# Altium PCB OmniCore_SDR.PcbDoc (part 9 of 13)
Units mil, origin at the board's own origin, x right, y up, seen from the top; angles counter-clockwise.
Board outline 4724.72 x 2755.91 mil, 8 copper layers (Top, GND 1, Layer 1, Layer 2, GND 2, Layer 3, Power, Bottom), stack 40.468 mil thick; 530 components, 427 nets, 2315 pads, 1715 vias.
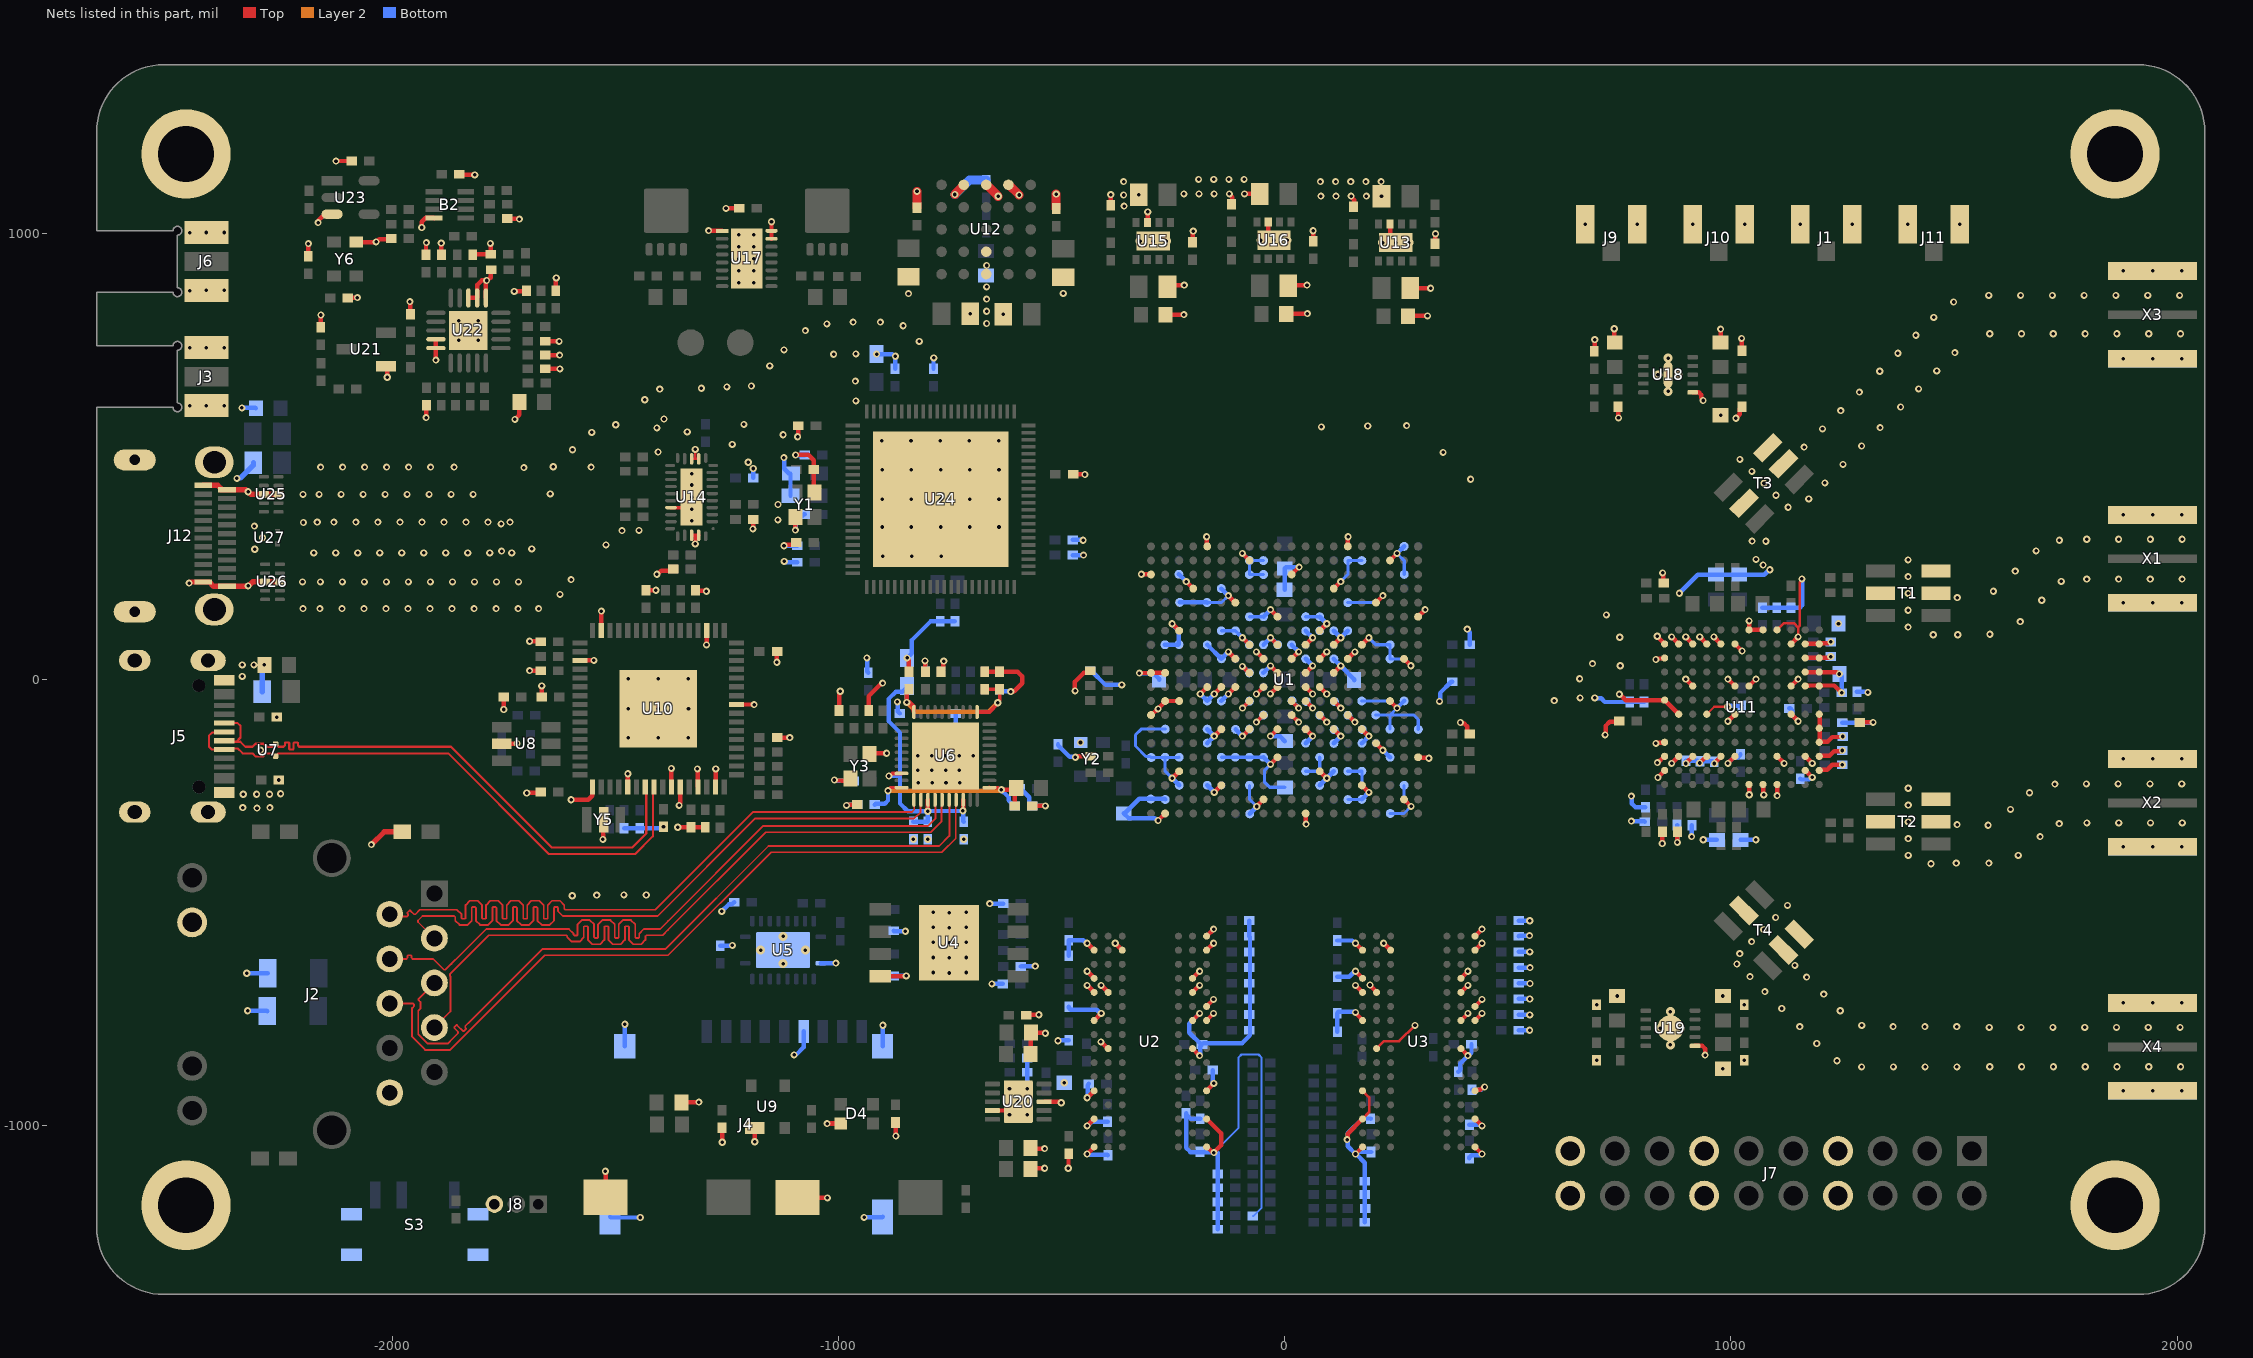
[diagram p14: the nets of this part, all layers, seen from the top]

## Via types
v1: diameter 16, hole 8, Top to Bottom, tented both sides, 1667 vias
v2: diameter 19.68, hole 7.87, Top to Bottom, 44 vias
v3: diameter 200, hole 125, Top to Bottom, 4 vias

## Nets (pads, with @x,y where several pads share a name; then routed paths per layer and width w, separated by ;. In a path a pad name is that pad's centre, name@x,y a point inside that pad or via, vN(x,y) a via of type N, cw(c..) or ccw(c..) an arc to the next point about the centre after c; other vN are vias at no path point) (continued)
GND: 1.1 2.1 3.1 4.1 B2.4 C1.2 C2.1 C3.2 C4.1 C5.2 C6.1 C7.1 C8.1 C9.1 C10.1 C11.1 C12.1 C13.1 C14.1 C15.1 C16.1 C17.1 C18.1 C19.1 C20.1 C21.1 C22.1 C23.1 C24.1 C25.1 C26.1 C27.1 C28.1 C29.1 C30.1 C31.1 C32.1 C33.1 C34.1 C35.1 C36.1 C37.1 C38.1 C39.1 C40.1 C41.1 C42.1 C43.1 C44.1 C45.1 C46.1 C47.1 C48.1 C49.1 C50.1 C51.1 C52.1 C53.1 C54.1 C55.1 C56.1 C57.1 C58.2 C59.1 C60.1 C61.1 C62.2 C63.1 C64.1 C65.1 C66.1 C67.1 C68.1 C69.1 C70.1 C71.1 C72.1 C73.1 C74.1 C75.1 C76.1 C77.1 C78.1 C79.1 C80.1 C81.1 C82.1 C83.1 C84.1 C85.1 C86.1 C87.1 C88.1 C89.1 C90.1 C91.1 C92.1 C93.1 C94.1 C95.1 C96.1 C97.1 C98.1 C99.1 C100.1 C101.1 C102.1 C103.1 C104.1 C105.1 C106.1 C107.1 C108.1 C109.1 C110.1 C111.1 C112.2 C113.2 C114.1 C115.1 C116.1 C117.1 C118.1 C119.1 C120.1 C121.1 C122.1 C125.2 C126.2 C127.1 C128.1 C129.2 C130.2 C131.1 C132.2 C133.2 C134.2 C135.2 C136.1 C137.1 C138.1 C139.1 C140.1 C141.1 C142.2 C143.1 C144.1 C145.1 C146.1 C147.1 C148.1 C149.2 C154.1 C155.1 C156.1 C157.1 C158.2 C159.2 C160.2 C161.2 C162.2 C163.1 C164.1 C165.2 C166.2 C167.2 C168.2 C169.1 C170.1 C171.2 C172.1 C173.1 C174.1 C175.1 C176.1 C177.1 C178.2 C179.1 C180.1 C181.1 C182.1 C183.1 C184.1 C185.1 C186.1 C187.1 C188.1 C189.1 C190.1 C191.1 C192.1 C193.1 C194.1 C195.1 C196.1 C197.2 C198.1 C200.1 C201.1 C202.1 C203.1 C204.1 C205.1 C206.1 C207.1 C208.1 C209.1 C210.1 C211.1 C212.1 C213.1 C214.1 C215.1 C216.1 C217.1 C218.1 C219.1 C226.2 C227.2 C230.2 C231.2 C232.1 C233.2 C234.1 C235.2 C236.1 C237.1 C238.1 C239.1 C240.2 C241.2 C242.2 C243.1 C244.1 C245.1 C246.1 C247.1 C248.1 C249.1 C250.1 C251.2 C253.1 C254.1 C255.1 C256.2 C257.2 C258.1 C259.1 C260.1 C262.2 C263.1 C264.1 C265.1 C266.1 C267.1 C268.1 C269.1 C270.1 C271.1 C272.1 C273.2 C276.1 C277.1 C279.1 C280.1 C281.1 C282.1 C283.1 C284.1 C285.1 C287.2 C288.2 C289.2 C292.1 C293.1 C294.1 C296.2 C297.1 C298.1 C299.1 C300.1 C301.1 C302.2 C303.1 C304.1 C305.1 C306.1 C307.1 C308.1 C309.1 D4.2 D5.2 J1.2 J1.3 J2.10 J2.12 J3.2 J3.3 J4.6 J4.10 J4.11 J4.12 J4.13 J5.0 J5.A1 J5.A12 J5.B1 J5.B12 J6.2 J6.3 J7.7 J7.8 J7.13 J7.14 J7.19 J7.20 J8.3 J9.2 J9.3 J10.2 J10.3 J11.2 J11.3 J12.1 J12.2 J12.3 J12.4 J12.A1 J12.A12 J12.B1 J12.B12 R2.1 R7.1 R10.2 R11.2 R15.2 R16.2 R17.2 R24.2 R25.2 R27.1 R55.2 R56.2 R58.2 R59.1 R60.1 R61.1 R62.2 R68.1 R70.1 R71.2 R73.1 R82.2 R83.2 R84.2 R85.2 R87.2 R88.1 R100.2 R110.1 R112.2 R114.2 R118.2 R123.2 R124.1 R126.1 R129.1 R130.1 R135.2 R136.1 R144.1 R145.1 S1.2 S2.2 S3.4 T1.1 T1.2 T1.5 T2.1 T2.2 T2.5 T3.1 T3.2 T3.5 T4.1 T4.2 T4.5 U1.A8 U1.A11 U1.A18 U1.B1 U1.B9 U1.B11 U1.C4 U1.C9 U1.C14 U1.D17 U1.E10 U1.E20 U1.F3 U1.F7 U1.F10 U1.G10 U1.G12 U1.G16 U1.H7 U1.H9 U1.H11 U1.H13 U1.H19 U1.J2 U1.J8 U1.J10 U1.J12 U1.K5 U1.K7 U1.K10 U1.K11 U1.K13 U1.K15 U1.L8 U1.L9 U1.L12 U1.L18 U1.M1 U1.M7 U1.M9 U1.M10 U1.M11 U1.M13 U1.N4 U1.N8 U1.N10 U1.N12 U1.N14 U1.P7 U1.P9 U1.P11 U1.P13 U1.P17 U1.R8 U1.R12 U1.R20 U1.T3 U1.T7 U1.T13 U1.U6 U1.U16 U1.V9 U1.V19 U1.W2 U1.W12 U1.Y5 U1.Y15 U2.A9 U2.B1 U2.B3 U2.B9 U2.D1 U2.D8 U2.E1 U2.E2 U2.E8 U2.F9 U2.G1 U2.G8 U2.G9 U2.J2 U2.J8 U2.M1 U2.M9 U2.P1 U2.P9 U2.T1 U2.T9 U3.A9 U3.B1 U3.B3 U3.B9 U3.D1 U3.D8 U3.E1 U3.E2 U3.E8 U3.F9 U3.G1 U3.G8 U3.G9 U3.J2 U3.J8 U3.M1 U3.M9 U3.P1 U3.P9 U3.T1 U3.T9 U4.4 U4.9 U5.11 U5.21 U6.41 U7.3 U8.2 U9.1 U10.1 U10.5 U10.10 U10.11 U10.13 U10.15 U10.25 U10.35 U10.47 U10.51 U11.A4 U11.A5 U11.A6 U11.B1 U11.B2 U11.B12 U11.C1 U11.C2 U11.C4 U11.C7 U11.C8 U11.C9 U11.C10 U11.C11 U11.C12 U11.D1 U11.D12 U11.E1 U11.F1 U11.F3 U11.F7 U11.F9 U11.F11 U11.G12 U11.H1 U11.H2 U11.H3 U11.H6 U11.H7 U11.H10 U11.J1 U11.J2 U11.K1 U11.K2 U11.K12 U11.L1 U11.L2 U11.L3 U11.L7 U11.L8 U11.L9 U11.L10 U11.L11 U11.L12 U11.M4 U11.M5 U11.M6 U12.B5 U12.C1 U12.C2 U12.C5 U12.D5 U13.3 U13.9 U14.12 U14.13 U14.22 U14.28 U14.29 U14.31 U15.3 U15.9 U16.3 U16.9 U17.1 U17.15 U17.16 U17.17 U18.6 U18.11 U19.6 U19.11 U20.4 U20.8 U20.11 U21.1 U22.1 U22.2 U22.3 U22.9 U22.10 U22.21 U23.3 U24.89 U25.3@-2287.76,415.24 U25.8@-2254.88,415.24 U26.3@-2284.76,218.87 U26.8@-2251.88,218.87 U27.3 X1.2 X2.2 X3.2 X4.2 Y1.2 Y1.4 Y2.2 Y3.2 Y3.4 Y5.2 Y6.2 | length 18682.3
  Top w4.2: U11.B12@851,-204.03 U11.B12@851.51,-203.52 ; U11.C12@851.25,-172.28 U11.C12@851.51,-172.02 ; U11.L12@851.26,80.2 U11.L12@851.51,79.94 ; U11.M6@1039.99,111.94 U11.M6@1040.49,111.44 ; U11.A6@1040.49,-235.02 U11.A6@1040.99,-235.52 ; U11.A5@1071.98,-235.02 U11.A5@1072.24,-235.27
  Top w5: U11.F9@946,-77.54 962.54,-61 v1(993,-61)
  Top w6: U14.13@-1329,494.65 -1321.13,494.65 ; v1(-1321,516) -1321.13,515.87 -1321.13,494.65 ; U14.12@-1313.25,494.65 -1321.13,494.65 ; U3.P1@174.52,-984.45 189.39,-969.58 189.39,-936.32 U3.M1@174.52,-921.45 ; U3.J2@206.02,-826.97 222.65,-810.33 256.67,-810.33 v1(292,-775) ; U11.M4@1103.48,111.44 1118.55,126.51 1141.22,126.51 1150.72,117.01 ; v1(1150.72,95.69) 1150.72,117.01 ; v1(1159.1,225.6) 1159.1,222.89 1154.49,218.29 1154.49,120.78 1150.72,117.01
  Top w8: U14.22@-1375.28,385.38 -1349.61,385.38 -1329,405.98 v1(-1329,409) ; U14.28@-1329,323.35 -1321.13,323.35 ; v1(-1321,304) -1321,323.22 -1321.13,323.35 ; U14.29@-1313.25,323.35 -1321.13,323.35
  Top w10: C262.2@-2188.35,948.72 -2188,949.06 v1(-2188,977) ; v1(-2166,1024) -2164.85,1025.15 -2164.85,1029.76 -2157.14,1037.47 -2156.39,1037.47 -2150.92,1042.94 U23.3@-2134.7,1042.94 ; R112.2@-2160.35,790.03 -2160.17,790.2 -2160.17,816.83 v1(-2160,817) ; v1(-2126,1162) -2125.83,1162.17 -2091.2,1162.17 C289.2@-2091.03,1162.35 ; C273.2@-2099.98,855.35 -2099.65,855.67 -2078.33,855.67 v1(-2078,856) ; Y6.2@-2080.35,980.15 -2079.92,980.57 -2036.43,980.57 v1(-2036,981) -2034.38,981 -2028.84,986.53 -2003.84,986.53 C285.1@-2002.03,988.35 ; U21.1@-2013.84,702.54 -2011.26,699.95 v1(-2011.26,677.48) ; v1(-1960.28,847.07) -1959.35,846.14 R114.2@-1959.35,819.03 ; v1(-1933.78,1013.12) -1934,1013.33 -1934,1026 -1925,1035 -1906.87,1035 B2.4@-1906.21,1034.35 ; C283.1@-1924.35,952.03 -1924.35,978.22 v1(-1923.3,979.26) ; v1(-1924,587) -1923.67,587.33 -1923.67,614.33 R136.1@-1923.35,614.66 ; U22.9@-1902.18,762.66 U22.10@-1902.18,742.98 -1902.18,716.18 v1(-1902,716) ; v1(-1890,978) -1889.67,977.67 -1889.67,952.36 C284.1@-1889.35,952.03 ; C288.2@-1849.66,1132.35 -1848.99,1131.67 -1815.67,1131.67 v1(-1815,1131) ; U22.3@-1829.35,855.18 U22.2@-1809.66,855.18 -1809.58,855.26 -1809.58,884.42 -1799.57,894.43 v1(-1788.34,894.43) ; C279.1@-1819.35,952.03 -1818.69,952.69 -1779.69,952.69 R123.2@-1779.03,953.35 -1779.03,976.5 v1(-1779.96,977.43) ; U22.1@-1789.98,855.18 -1789.9,855.26 -1789.9,891.25 -1788.34,892.8 v1(-1788.34,894.43) ; C277.1@-1778.03,918.35 -1779,917.38 -1779,900.28 -1780.86,900.28 -1786.72,894.43 v1(-1788.34,894.43) ; U8.2@-1754.46,-144 -1753.96,-143.5 -1720.5,-143.5 v1(-1720,-143) ; v1(-1750,-67) C179.1@-1750.02,-39 ; C287.2@-1742.66,1033.35 -1741.99,1032.67 -1715.67,1032.67 v1(-1715,1032) ; v1(-1726.56,869.88) -1700.5,869.88 C276.1@-1699.35,871.03 ; v1(-1725,583) -1715,593 -1715,622.25 D5.2@-1714.91,622.34 ; v1(-1698.59,-254.12) -1669.14,-254.12 C189.1@-1667.02,-252 ; v1(-1692,20) C177.1@-1667.02,20 ; v1(-1692,86) -1691.5,85.5 -1667.52,85.5 C187.1@-1667.02,85 ; C195.1@-1665.02,-39 v1(-1665,-14) ; R135.2@-1656.98,758.35 -1656.8,758.17 -1626.17,758.17 v1(-1626,758) ; C282.1@-1656.66,696.35 -1624.41,696.35 v1(-1624.32,696.26) ; C281.1@-1656.66,727.35 -1656.49,727.17 -1625.17,727.17 v1(-1625,727) ; C280.1@-1633.35,871.03 -1633.35,899.28 v1(-1632.55,900.08) ; v1(-1599,-269.21) -1598.78,-269 -1560.58,-269 -1552.08,-260.5 -1552.08,-241.57 U10.1@-1551.17,-240.67 ; U10.51@-1578.73,42.8 -1578.63,42.9 -1548.1,42.9 v1(-1548,43) ; U10.47@-1531.49,109.72 -1531.29,109.92 -1531.29,153.31 v1(-1531.1,153.5) ; v1(-1528,-358) -1527.17,-357.17 -1527.17,-314.83 Y5.2@-1526.34,-314 ; v1(-1522.38,-1101.84) -1521.59,-1102.64 S2.2@-1521.59,-1160 ; U10.5@-1472.43,-240.67 -1472.22,-240.45 -1472.22,-211.22 v1(-1472,-211) ; C193.1@-1431.34,200.68 -1431.09,200.43 -1409.43,200.43 v1(-1409.18,200.18) ; v1(-1407,236) -1405.38,236 -1397.5,243.88 -1374.8,243.88 C3.2@-1370.69,248 ; v1(-1374.48,-199.17) -1374.24,-199.41 -1374.24,-240.43 U10.10@-1374.01,-240.67 ; v1(-1360,-331) -1359.84,-330.84 -1330.5,-330.84 C190.1@-1330.34,-330.68 C186.1@-1298.34,-330.68 ; v1(-1356.99,-282.07) -1356.99,-280.45 -1354.16,-277.62 -1354.16,-240.83 U10.11@-1354.32,-240.67 ; R25.2@-1351.64,-947 v1(-1312.6,-947) ; C191.1@-1320.34,200.68 -1318.8,199.15 -1297.15,199.15 v1(-1296,198) ; v1(-1316,-200) -1315.48,-200.52 -1315.48,-240.15 U10.13@-1314.95,-240.67 ; v1(-1295.65,77.74) -1295.46,77.93 -1295.46,109.53 U10.35@-1295.27,109.72 ; v1(-1291,1006) -1290.85,1005.85 -1260.62,1005.85 U17.1@-1260.48,1005.7 ; U10.15@-1275.58,-240.67 -1275.29,-240.38 -1275.29,-200.29 v1(-1275,-200) ; C113.2@-1261.1,-1004.39 -1260.75,-1004.74 -1260.75,-1036.55 v1(-1260.4,-1036.9) ; v1(-1252,1056) -1251.87,1056.13 -1222.29,1056.13 C251.2@-1222.16,1056.27 ; U10.25@-1228.34,-55.63 -1228.15,-55.81 -1189.19,-55.81 v1(-1189,-56) ; v1(-1191.64,337.59) -1191.31,337.91 R11.2@-1191.31,359 ; v1(-1187.68,-1035.58) -1187.63,-1035.52 U9.1@-1187.63,-1004.94 ; U17.15@-1150,987.98 U17.16@-1150,1005.7 v1(-1150,1026) ; v1(-1138,39) -1137.83,39.17 -1137.83,62.83 C194.1@-1137.65,63 ; C192.1@-1137.65,-130 v1(-1109,-130) ; v1(-1122,300) -1120.38,300 -1118.22,302.16 -1099.53,302.16 C162.2@-1094.69,307 ; Y1.4@-1096.65,364.44 -1096.5,364.29 v1(-1096.5,335.1) ; v1(-1096.1,503.3) -1095.17,504.23 -1067.86,504.23 -1055.31,491.69 C161.2@-1055.31,471 -1055.31,421.52 Y1.2@-1053.35,419.56 ; S1.2@-1091.59,-1161 -1091.19,-1161.4 v1(-1024.9,-1161.4) ; v1(-1091.56,544.2) -1089.68,546.07 C163.1@-1089.68,569 ; v1(-1009,-225) -1007.85,-226.15 -994.85,-226.15 -994,-227 -978.3,-227 Y3.4@-973.3,-222 ; C61.1@-999,-69.32 -998.5,-68.82 -998.5,-30.12 -996,-27.62 v1(-996,-26) ; v1(-982,-282) -981,-281 -958.68,-281 C58.2@-957.69,-280 ; R73.1@-932,-69.32 -932,-36.98 -908.02,-13 -907.62,-13 -902.62,-8 v1(-901,-8) ; Y3.2@-930,-166.88 -928.12,-165 v1(-892,-165) ; U4.4@-906.4,-665 -905.9,-664.5 -848.5,-664.5 v1(-848,-664) ; C112.2@-872.1,-992.59 -871.65,-993.04 -871.65,-1022.35 v1(-871.2,-1022.8) ; v1(-846,48.5) -846,46.87 -842,42.87 C146.1@-842,17.68 ; v1(-806,42) -805.5,41.5 -805.5,18.18 R70.1@-805,17.68 ; R68.1@-770,17.68 -765.16,22.53 -765.16,38.72 -764,39.88 v1(-764,41.5) ; C148.1@-672,17.68 C147.1@-639,17.68 -598.68,17.68 -588,7 -588,-8.04 -605.81,-25.85 -612.85,-25.85 v1(-614,-27) ; U20.4@-655.07,-965.68 -624.48,-965.68 -616.69,-973.48 v2(-616.69,-975.53) ; C78.1@-579.32,-752 -578.86,-751.55 -551.25,-751.55 v1(-550.8,-751.1) ; C134.2@-569.44,-1097 -567.44,-1095 v1(-538,-1095) ; C125.2@-569.44,-1050 -568.44,-1051 v1(-538,-1051) ; C168.2@-569.44,-839 -569.44,-792 C167.2@-568.44,-791 -537.71,-791 v1(-536.26,-792.45) ; C75.1@-565.32,-283 C75.1@-565.32,-283 -536.39,-282.96 v1(-536.35,-282.92) ; U20.8@-538.93,-946 -504.59,-946 -502.27,-948.32 v1(-500.64,-948.32) ; v1(-485,-1095) -484.5,-1094.5 -484.5,-1063.19 C165.2@-484,-1062.69 ; C130.2@-474.31,460 -448.04,460 v1(-447.66,459.62) ; v1(-469.5,-25.44) -470,-24.94 -470,-5 -449.84,15.16 -440.21,15.16 C4.1@-435.37,20 ; v1(-469,-174) -467.38,-174 -465.38,-172 R17.2@-434.69,-172 ; v1(-442.72,-1063.19) U2.T1@-426.98,-1047.44 ; v1(-442.72,-1000.19) U2.P1@-426.98,-984.45 ; v1(-442.72,-937.2) U2.M1@-426.98,-921.45 ; v1(-442.72,-685.23) U2.E1@-426.98,-700.98 ; v1(-442.72,-653.74) U2.D1@-426.98,-669.49 ; v1(-442.72,-590.75) U2.B1@-426.98,-606.49 ; U2.G1@-426.98,-763.97 v1(-411,-748) ; v1(-412,-812) -411.22,-812 -396.26,-826.97 U2.J2@-395.48,-826.97 ; v1(-411.23,-685.23) U2.E2@-395.48,-700.98 ; v1(-389.78,1086.78) -389.78,1063.59 R129.1@-389.56,1063.37 ; v1(-379.73,-590.75) U2.B3@-363.98,-606.49 ; v1(-325.7,14.5) -325.47,14.73 -300.44,14.73 -299.46,15.71 -298.7,14.96 U1.B11@-267.96,14.96 ; v1(-321,236) -320.72,235.72 -299.74,235.72 U1.A18@-299.46,235.43 ; U15.3@-307.35,1024.02 -307.18,1024.2 -307.18,1047.82 v1(-307,1048) ; U1.A8@-299.46,-79.53 -298.43,-79.53 -284.62,-65.72 v1(-283.59,-65.72) -283.59,-64.69 -267.96,-49.06 U1.B9@-267.96,-48.03 U1.C9@-236.46,-48.03 ; v1(-283.71,-315.75) U1.B1@-267.96,-300 ; C292.1@-267,817.69 -266.69,818 v1(-226,818) ; C247.1@-262.56,880.69 -259.24,884 v1(-225,884) ; v1(-252.21,-221.26) U1.C4@-236.46,-205.51 ; v1(-252.21,125.2) U1.C14@-236.46,109.45 ; v1(-220.72,219.68) U1.D17@-204.97,203.94 ; C249.1@-206.56,980.37 -205.78,981.15 -205.78,1004.22 v1(-205,1005) ; U2.J8@-206.5,-826.97 v1(-190.76,-842.71) ; U2.G8@-206.5,-763.97 v1(-190.76,-748.23) ; U2.E8@-206.5,-700.98 v1(-190.76,-685.23) ; U2.D8@-206.5,-669.49 v1(-190.76,-653.74) ; v1(-189.22,-32.28) U1.E10@-173.47,-16.54 ; U2.T9@-175.01,-1047.44 -173.46,-1047.44 -162.04,-1058.85 -159.65,-1058.85 v1(-158.5,-1060) -158.5,-1059.47 -142.5,-1043.47 -142.5,-1016.95 U2.P9@-175.01,-984.45 ; U2.M9@-175.01,-921.45 -175.01,-921.21 -158.98,-905.18 v1(-158.98,-904.93) ; U2.G9@-175.01,-763.97 -175.01,-763.85 -159.5,-748.35 v1(-159.5,-748.23) ; U2.F9@-175.01,-732.48 -175.01,-732.36 -159.5,-716.85 v1(-159.5,-716.73) ; U2.B9@-175.01,-606.49 v1(-159.26,-590.75) ; U2.A9@-175.01,-575 v1(-159.26,-559.25) ; v1(-175,320) -174.24,319.24 -174.24,299.19 U1.E20@-173.47,298.43 ; v1(-157.72,-252.76) U1.F3@-141.98,-237.01 ; v1(-157.72,-126.77) U1.F7@-141.98,-111.02 ; v1(-157.72,-32.28) U1.F10@-141.98,-16.54 ; v1(-126.23,-32.28) U1.G10@-110.48,-16.54 ; v1(-126.23,62.2) U1.G12@-110.48,46.46 ; v1(-126.23,188.19) U1.G16@-110.48,172.44 ; v1(-124,1088.37) -124,1088 -117,1081 -117,1067.06 R130.1@-119,1065.06 ; v1(-94.73,-126.77) U1.H7@-78.98,-111.02 ; v1(-94.73,29.6) -94.18,29.6 -79.54,14.96 U1.H11@-78.98,14.96 ; v1(-94.73,93.7) U1.H13@-78.98,77.95 ; v1(-94.73,282.68) U1.H19@-78.98,266.93 ; v1(-94.6,-63.78) -94.6,-63.71 -78.98,-48.1 U1.H9@-78.98,-48.03 ; v1(-90,1088.37) C245.1@-56,1088.37 ; v1(-63.24,-95.28) U1.J8@-47.49,-79.53 ; v1(-63.24,-32.28) U1.J10@-47.49,-16.54 ; v1(-63.24,62.2) U1.J12@-47.49,46.46 ; v1(-62.6,-284.39) -62.6,-284.01 -47.49,-268.89 U1.J2@-47.49,-268.5 ; U16.3@-36.8,1025.71 -36.8,997.17 v2(-24,984.37) ; v1(-31.89,-31.95) -31.65,-31.95 -16.23,-16.54 U1.K10@-15.99,-16.54 ; v1(-31.74,-190) -31.74,-189.88 -15.99,-174.13 U1.K5@-15.99,-174.02 ; v1(-31.74,-126.77) U1.K7@-15.99,-111.02 ; v1(-31.74,30.71) U1.K11@-15.99,14.96 ; v1(-31.74,93.7) U1.K13@-15.99,77.95 ; v1(-31.74,156.69) U1.K15@-15.99,140.94 ; C294.1@3.56,819.37 4.19,820 v1(51,820) ; C293.1@8,882.37 9.77,884.14 v1(50.03,884.14) ; U1.L8@15.5,-79.53 v1(31.25,-95.28) ; U1.L9@15.5,-48.03 v1(31.25,-63.78) ; U1.L12@15.5,46.46 v1(31.25,62.2) ; U1.L18@15.5,235.43 v1(32.25,252.18) ; U1.M1@47,-300 47.5,-300.5 47.5,-323.5 v1(48,-324) ; U1.M7@47,-111.02 v1(62.75,-126.77) ; U1.M9@47,-48.03 v1(62.75,-63.78) ; U1.M10@47,-16.54 v1(62.75,-32.28) ; U1.M11@47,14.96 v1(62.75,30.71) ; U1.M13@47,77.95 v1(62.75,93.7) ; v1(63.8,1005.9) 63.9,1005.8 63.9,982.16 C250.1@64,982.06 ; U1.N4@78.5,-205.51 v1(94.24,-221.26) ; U1.N8@78.5,-79.53 v1(94.24,-95.28) ; U1.N10@78.5,-16.54 v1(94.24,-32.28) ; U1.N12@78.5,46.46 v1(94.24,62.2) ; U1.N14@78.5,109.45 v1(94.24,125.2) ; U1.P7@109.99,-111.02 v1(125.74,-126.77) ; U1.P9@109.99,-48.03 v1(125.74,-63.78) ; U1.P11@109.99,14.96 v1(125.74,30.71) ; U1.P13@109.99,77.95 v1(125.74,93.7) ; U1.P17@109.99,203.94 v1(125.74,219.68) ; v1(140,-1031) 141.15,-1029.85 141.15,-1017.82 U3.P1@174.52,-984.45 ; U1.R8@141.49,-79.53 v1(157.24,-95.28) ; U1.R12@141.49,46.46 v1(157.24,62.2) ; U1.R20@141.49,298.43 141.74,298.68 141.74,319.74 v1(142,320) ; v1(149,1083.37) 150.14,1083.37 150.14,1080.6 156,1074.75 156,1062.06 R124.1@154,1060.06 ; v1(158.77,-1063.19) U3.T1@174.52,-1047.44 ; v1(158.77,-745.72) 158.77,-746.97 174.52,-762.72 U3.G1@174.52,-763.97 ; v1(158.77,-685.23) U3.E1@174.52,-700.98 ; v1(158.77,-653.74) U3.D1@174.52,-669.49 ; v1(158.77,-590.75) U3.B1@174.52,-606.49 ; U1.T3@172.98,-237.01 v1(188.73,-252.76) ; U1.T7@172.98,-111.02 v1(188.73,-126.77) ; U1.T13@172.98,77.95 v1(188.73,93.7) ; v1(191.14,-684.36) 191.14,-685.23 206.02,-700.11 U3.E2@206.02,-700.98 ; U1.U6@204.48,-142.52 v1(220.23,-158.27) ; U1.U16@204.48,172.44 v1(220.23,188.19) ; v1(221.77,-590.75) U3.B3@237.51,-606.49 ; U1.V9@235.98,-48.03 v1(251.72,-63.78) ; U1.V19@235.98,266.93 v1(251.72,282.68) ; U13.3@236.2,1020.71 236.2,992.17 v2(249,979.37) ; U1.W2@267.47,-268.5 v1(283.22,-284.25) ; U1.W12@267.47,46.46 v1(283,31) ; C248.1@276.56,814.37 277.19,815 v1(320,815) ; C234.1@281,877.37 281.37,877 v1(327,877) ; U1.Y5@298.97,-174.02 300.19,-175.24 322.03,-175.24 v1(323.18,-176.39) ; U1.Y15@298.97,140.94 v1(314.72,156.69) ; C239.1@337,977.06 337.5,977.56 337.5,998.5 v1(338,999) ; v1(393.8,-96.2) 394.95,-97.35 401.05,-97.35 408.76,-105.06 408.76,-117.16 413.6,-122 R144.1@414.69,-122 ; U3.J8@394.99,-826.97 v1(410.74,-842.71) ; U3.G8@394.99,-763.97 v1(410.74,-748.23) ; U3.E8@394.99,-700.98 v1(410.74,-685.23) ; U3.D8@394.99,-669.49 v1(410.74,-653.74) ; U3.T9@426.49,-1047.44 v1(442.24,-1063.19) ; U3.P9@426.49,-984.45 v1(442.24,-1000.19) ; U3.M9@426.49,-921.45 428.7,-919.25 438.56,-919.25 444.81,-913 v1(448,-913) ; U3.G9@426.49,-763.97 v1(442.24,-748.23) ; U3.F9@426.49,-732.48 v1(442.24,-716.73) ; U3.B9@426.49,-606.49 v1(442.24,-590.75) ; U3.A9@426.49,-575 v1(442.24,-559.25) ; C254.1@693.77,735.62 694.39,736.23 694.39,761.29 v1(695,761.9) ; v1(718,-124) 719.15,-122.85 719.15,-103.85 728.36,-94.64 747.68,-94.64 C131.1@749.31,-93 ; v1(738.5,786.1) 738.5,756.76 C253.1@739.77,755.49 ; R85.2@746.77,611.25 747.44,610.58 747.44,587.26 v1(748.1,586.6) ; v1(750,-33) 751.62,-33 764.66,-46.04 U11.G12@851.51,-46.04 U11.F11@883.01,-77.54 ; v1(832,-143) 833.62,-143 834.92,-141.7 850.34,-141.7 U11.D12@851.51,-140.53 ; v1(832,45) 833.62,45 835.9,47.27 850.34,47.27 U11.K12@851.51,48.45 ; v1(835,97) 835,96.73 851.26,80.47 U11.L12@851.26,80.2 ; v1(835.2,-186.1) 836.32,-186.1 850.13,-172.28 U11.C12@851.25,-172.28 ; v1(836.5,-219.5) 836.5,-219.02 851,-204.52 U11.B12@851,-204.03 ; v1(846.04,-367.29) 846.5,-366.83 R82.2@846.5,-341.23 ; v1(847,239) 848.09,237.91 848.09,217.55 R88.1@849.18,216.46 ; v1(867.26,-187.77) U11.C11@883.01,-172.02 ; v1(867.26,95.69) U11.L11@883.01,79.94 ; v1(880,-365) 880.25,-364.75 880.25,-341.48 C211.1@880.5,-341.23 ; v1(898.76,1.2) U11.H10@914.5,-14.54 ; v1(898.76,95.69) U11.L10@914.5,79.94 ; v1(899,-188) 899,-187.76 914.5,-172.26 U11.C10@914.5,-172.02 ; U18.6@914.3,643.76 927.63,643.76 933.48,637.9 933.48,631.34 937.7,627.12 v1(937.7,625.5) ; U19.6@919.51,-820.77 919.79,-821.05 936.15,-821.05 942.1,-827 v1(942.1,-841.7) ; v1(930,-187) 930.51,-187 945.49,-172.02 U11.C9@946,-172.02 ; v1(930.25,95.69) U11.L9@946,79.94 ; U11.F9@946,-77.61 U11.F9@946,-77.54 ; v1(961.75,95.69) U11.L8@977.5,79.94 ; v1(963,-188) 963,-187.26 977.5,-172.76 U11.C8@977.5,-172.02 ; C240.2@976.77,755.49 977,755.72 v1(977,785.3) ; v1(993.24,-187.77) U11.C7@1008.99,-172.02 ; v1(993.24,-93.28) U11.F7@1008.99,-77.54 ; v1(993.24,1.2) U11.H7@1008.99,-14.54 ; U11.L7@1008.99,79.94 v1(1025,64) ; v1(1011.26,585.5) 1011.26,585.69 1019.93,594.36 1019.93,606.41 R84.2@1024.77,611.25 ; v1(1023.88,764.67) 1024.32,764.22 1024.32,737.07 C235.2@1024.77,736.62 ; U11.M6@1039.99,111.94 1040.69,112.64 1040.69,131.39 v1(1040.9,131.6) ; U11.H6@1040.49,-14.54 v1(1056.24,1.2) ; U11.M6@1040.49,111.44 U11.M5@1071.98,111.44 ; v1(1040.99,-258.04) U11.A6@1040.99,-235.52 ; U11.A5@1072.24,-235.27 1072.84,-235.87 1072.84,-257.64 v1(1073.7,-258.5) ; v1(1103.49,-260.09) U11.A4@1103.48,-235.02 ; U11.C4@1103.48,-172.02 v1(1119.23,-187.77) ; U11.F3@1134.98,-77.54 v1(1150.72,-93.28) ; U11.H3@1134.98,-14.54 v1(1150.72,1.2) ; U11.L3@1134.98,79.94 v1(1150.72,95.69) ; U11.B2@1166.47,-203.52 v1(1182.22,-219.27) ; U11.C2@1166.47,-172.02 v1(1182.22,-187.77) ; U11.H2@1166.47,-14.54 1167.65,-13.37 1175.1,-13.37 1175.18,-13.29 1231.91,-13.29 v1(1248.18,-29.54) ; U11.J2@1166.47,16.95 U11.J1@1197.97,16.95 1236.94,16.95 1241.43,12.46 v1(1243.06,12.46) ; U11.K2@1166.47,48.45 U11.K1@1197.97,48.45 1219.23,48.45 1222.24,51.46 v1(1223.87,51.46) ; U11.L2@1166.47,79.94 U11.L1@1197.97,79.94 1199.14,81.12 1219.22,81.12 1222.56,84.46 v1(1224.18,84.46) ; U11.B1@1197.97,-203.52 1199.14,-202.34 1215.76,-202.34 1227.1,-191 v1(1249.69,-191) ; U11.C1@1197.97,-172.02 1199.14,-170.85 1220.95,-170.85 1231.65,-160.15 1248.54,-160.15 v1(1249.69,-159) ; U11.F1@1197.97,-77.54 1199.14,-78.71 1199.14,-86.16 1199.22,-86.24 1199.22,-106.12 1197.97,-107.37 U11.E1@1197.97,-109.03 1199.14,-110.21 1199.14,-139.35 1216.55,-139.35 1227.21,-128.69 1249.03,-128.69 v1(1250.18,-127.54) ; R83.2@1288.69,-96 1288.76,-96.08 v1(1318.66,-96.08)
  Top w12: v1(-2455.2,216.1) -2454.12,216.1 -2451.58,218.64 -2423.54,218.64 J12.B1@-2423.45,218.73 -2409.86,218.73 -2400.11,208.98 -2370.4,208.98 J12.A12@-2370.31,208.89 -2325.19,208.89 -2324.08,210 v1(-2323,210) -2321.92,210 -2313.04,218.87 U26.3@-2284.76,218.87 U26.8@-2251.88,218.87 ; J12.B12@-2423.45,435.27 -2391.02,435.27 -2383.99,428.24 -2383.99,425.51 -2383.9,425.42 J12.A1@-2370.31,425.42 v1@-2328.5,425.42 ; v1(-2323,421) -2321.92,421 -2316.16,415.24 U25.3@-2287.76,415.24 U25.8@-2254.88,415.24 ; v1(-2046.56,-369.79) -2017.76,-341 C142.2@-1977.5,-341 ; v1(-1025.5,-995) -1025.38,-994.88 -994.95,-994.88 D4.2@-994.82,-994.75
  Top w20: C246.1@-824,1057.69 v1(-824,1094) ; v1(-739,1087) -739,1087.71 -719,1107.7 U12.B5@-719,1108.69 ; U12.C5@-669,1108.69 -668.02,1108.69 -642.33,1083 v1(-642,1083) ; U12.D5@-619,1108.69 -618.02,1108.69 -595.33,1086 v1(-595,1086) ; C243.1@-512,1055.69 v1(-512,1088)
  Bottom w4.5: v1(-158.5,-1060) -103.3,-1004.8 -103.3,-846.8 -96.75,-840.25 -58.65,-840.25 -51.6,-847.3 -51.6,-1184.03 -69.4,-1201.83 R58.2@-71.37,-1201.83
  Bottom w7: C42.1@-268,-174 C42.1@-268,-174.4 ; C70.1@-267.7,-111 -321.35,-111 -334.3,-123.95 -334.3,-149 -333.25,-150.05 -311.09,-172.21 -301.49,-172.21 C57.1@-299,-174.7 -298.7,-174.4 C42.1@-268,-174.4 ; v1(-252.21,-221.26) -268,-205.47 C42.1@-268,-174.4 ; C182.1@-236.5,-174.1 -236.8,-174.4 C42.1@-268,-174.4 ; C272.1@-174,172.7 -141.72,172.7 v1(-126.23,188.19) ; C14.1@-142,109.5 -110.47,109.5 -102.47,101.5 ; C41.1@-141.9,-174 C6.1@-110.6,-174 -47.62,-174 C49.1@-47.5,-174.12 ; C56.1@-79.1,235.5 C56.1@-79.05,235.55 ; C55.1@-79,140.7 -78.9,140.8 -47.5,140.8 C9.1@-47.4,140.9 ; R27.1@-78.9,-237 -78.9,-268.09 v1(-62.6,-284.39) ; C183.1@-47.6,266.7 -47.7,266.8 -78.8,266.8 C184.1@-78.9,266.9 -79,266.8 -79,235.6 C56.1@-79.05,235.55 ; C71.1@-47.5,235.6 -47.55,235.65 -47.65,235.55 C56.1@-79.05,235.55 ; v1(-31.74,-190) -44.81,-203.09 -44.81,-230.19 -33.7,-241.3 -0.06,-241.3 C308.1@0.9,-242.26 ; C35.1@47,-205.4 47.1,-205.5 78.48,-205.5 ; C53.1@47,141 47.05,140.95 C48.1@78.5,140.9 C48.1@78.5,140.9 ; C32.1@78.4,-174.1 78.5,-174.2 78.5,-205.48 ; v1(94.24,-221.26) 78.48,-205.5 ; v1(125.74,219.68) 141.7,235.65 C59.1@141.7,267 141.85,266.85 172.85,266.85 C69.1@173,266.7 ; C7.1@141.4,-205.5 C7.1@141.4,-205.5 173.05,-205.45 C20.1@173.1,-205.4 173.1,-237.12 v1(188.73,-252.76) ; C72.1@141.4,172.5 204.54,172.5 v1(220.23,188.19) ; C22.1@141.7,-269 142,-268.7 172.8,-268.7 C45.1@173.1,-268.4 ; C29.1@172.7,-48 235.94,-48 v1(251.72,-63.78) 236.2,-79.3 ; v1(188.73,93.7) 204.33,78.1 C67.1@236.3,78.1 236.2,78 236.2,46.6 C68.1@236.1,46.5 267.5,46.5 v1(283,31) ; C65.1@204,-79.3 236.2,-79.3 ; C181.1@235.9,-111 235.9,-79.6 236.2,-79.3 ; C21.1@236.7,-300 267.47,-300 v1(283.22,-284.25) 267.7,-268.73 C19.1@267.7,-237 ; v1(251.72,282.68) 268,266.4 C73.1@268,235.7 ; C64.1@299.5,-111.6 299.22,-111.32 299.22,-89.35 289.16,-79.3 236.2,-79.3
  Bottom w10: v1(-2337,609) -2306.56,609 C302.2@-2305.56,608 ; v1(-2326,-658) C233.2@-2279.09,-658 ; v1(-2324,-742) -2281.09,-742 R145.1@-2280.09,-743 ; J4.12@-1512,-1204 -1510.5,-1205.5 v1(-1444.1,-1205.5) ; C196.1@-1480.34,-332.68 R110.1@-1445.34,-332.68 -1445.18,-332.84 -1396.78,-332.84 -1393.62,-329.69 v1(-1392,-329.69) ; J4.13@-1478.93,-822.04 -1478.93,-772.68 v1(-1478.71,-772.46) ; C133.2@-1265.1,-596.33 -1264.78,-596.01 -1237.91,-596.01 v1(-1237.6,-595.7) ; v1(-1261.4,-519.5) -1245.78,-503.88 -1238.74,-503.88 C132.2@-1233.9,-499.04 ; C1.2@-1191.31,452 -1191.16,452.16 -1191.16,472.84 v1(-1191,473) ; v1(-1122.4,497.6) -1121.5,496.7 -1121.5,472.75 -1109.99,461.24 -1107.5,461.24 C185.1@-1107.5,412 ; v1(-1122,300) C188.1@-1092.68,300 ; v1(-1121.52,264.85) -1119.66,263 C198.1@-1092.68,263 ; v1(-1099.38,-841.21) -1095.31,-841.21 -1078.14,-824.04 J4.6@-1078.14,-788.56 ; v1(-1096.5,335.1) -1095.35,336.25 -1095.35,352.3 -1077.65,370 C170.1@-1075.68,370 ; v1(-1096.1,503.3) -1095.95,503.15 -1075.52,503.15 C164.1@-1075.37,503 ; U5.11@-1039.57,-635.57 -1039.48,-635.48 -1005.78,-635.48 v1(-1005.7,-635.4) ; v1(-1009,-225) -1007.38,-225 -1005.38,-227 R71.2@-965.69,-227 ; v1(-982,-282) -981,-281 -958.68,-281 C74.1@-957.69,-280 ; v1(-942.5,-1205.2) -902.18,-1205.2 J4.11@-900.98,-1204 ; v1(-936.2,48.6) -935.05,47.45 -935.05,17.74 C145.1@-933,15.68 ; v1(-914.5,729.5) -879.09,729.5 -874.16,724.57 v1(-872.54,724.57) -873.09,724.01 C159.2@-873.09,696.69 ; J4.10@-900.98,-822.04 -900.28,-821.34 v1(-900.28,-774.65) ; R24.2@-876,-664 v1(-848,-664) ; R15.2@-876,-563 -875.5,-563.5 -850.5,-563.5 v1(-850,-564) ; v1(-868,-50) -866.85,-51.15 -866.85,-71.52 C136.1@-862.37,-76 ; v1(-846,48.5) -835.25,59.24 -835.25,88.75 -793.68,130.32 C156.1@-772,130.32 C154.1@-739,130.32 ; v1(-806,42) -805.5,41.5 -805.5,18.18 C143.1@-805,17.68 ; C158.2@-787,696.69 -787,720.54 v1(-786.54,720.99) ; C157.1@-778,277.5 -734,277.5 C155.1@-733,276.5 ; C137.1@-736.63,-76 -736.63,-161.75 -729,-169.38 v1(-729,-171) ; v1(-661,-502) C129.2@-630.69,-502 ; v1(-656,-682) R10.2@-631.69,-682 ; C138.1@-639,-21.68 -634.83,-25.85 -615.15,-25.85 v1(-614,-27) ; C144.1@-593.68,-244 -591.72,-244 -572.13,-263.59 -572.13,-278.16 -567.28,-283 C63.1@-565.32,-283 -536.43,-283 v1(-536.35,-282.92) ; R16.2@-591.31,-643 -590.81,-642.5 -559.5,-642.5 v1(-559,-642) ; v2(-577.32,-916.47) R59.1@-577.32,-848 ; C2.1@-508,-145 -508,-146.97 -482.12,-172.85 -470.15,-172.85 v1(-469,-174) ; v1(-507.97,-809.3) -507.35,-808.68 C87.1@-484,-808.68 ; C88.1@-484,-733.68 -484,-734.96 -479.16,-739.8 -420.82,-739.8 -412.62,-748 v1(-411,-748) ; C85.1@-484,-619.32 C96.1@-484,-584 -451.09,-584 -444.35,-590.75 v1(-442.72,-590.75) ; C149.2@-475.31,279 v1@-450.82,278.97 ; C135.2@-475.31,313 -452.39,313 v1(-451.59,312.2) ; v1(-442.72,-1063.19) -441.58,-1064.33 -397.35,-1064.33 C80.1@-396,-1065.68 ; v1(-442.72,-1000.19) -441.1,-1000.19 -431.59,-990.68 C86.1@-397,-990.68 ; v1(-442.72,-937.2) -441.58,-936.05 -441.58,-908.89 C92.1@-438.68,-906 ; R7.1@-434.68,20.68 R7.1@-435.37,20 -433.4,20 -401.4,-12 v1(-365,-12) ; v1(-325.7,14.5) -296.46,14.5 -294.28,12.32 -292.31,12.32 -281.56,1.57 C309.1@-281.56,-0.4 ; v1(-283.71,-315.75) -285.33,-315.75 -290.67,-310.41 -349.85,-310.41 C305.1@-360.6,-299.66 -358.63,-299.66 -326.22,-267.25 -269.25,-267.25 C44.1@-267.8,-268.7 ; C270.1@-268.3,78 -267.95,78.35 -238.78,78.35 -237.72,79.42 -237.72,109.08 -252.21,123.57 v1(-252.21,125.2) ; v1(-252.21,-221.26) C175.1@-236.4,-237 ; C54.1@-237,236 v1(-220.72,219.68) ; C269.1@-235.3,173 -205,173 -204.3,173.69 -174.99,173.69 C272.1@-174,172.7 ; C127.1@-221,-971.68 C127.1@-221,-973.65 ; v1(-190.76,-842.71) -189.61,-841.57 -189.61,-822.29 C82.1@-185.32,-818 ; v1(-190.76,-748.23) -213.8,-771.27 -213.8,-791.48 -187.28,-818 C82.1@-185.32,-818 ; v1(-189.22,-32.28) v1(-189.22,-32.28) -173.45,-48 C47.1@-173.4,-48 v1(-157.72,-32.28) ; C79.1@-189,-983.68 -210.97,-983.68 C127.1@-221,-973.65 ; C37.1@-173.7,-111 -173.6,-111 v1@-157.83,-126.77 ; C17.1@-173.6,-142.3 -173.43,-142.3 -157.9,-126.77 v1@-157.83,-126.77 ; C23.1@-173.5,-236.8 -173.5,-236.89 -157.72,-252.67 v1(-157.72,-252.76) ; C176.1@-173.5,77.7 -173.1,77.7 -142,46.6 -141.72,46.6 -126.23,62.09 v1(-126.23,62.2) ; R55.2@-161.31,-875 -161.31,-900.97 -158.98,-903.31 v1(-158.98,-904.93) ; v1(-157.72,-126.77) v1@-157.83,-126.77 ; C114.1@-149.68,-1232 C117.1@-149.68,-1201 C116.1@-149.68,-1171 C122.1@-149.68,-1139 C121.1@-149.68,-1108 -149.68,-1060 v1(-158.5,-1060) -159.65,-1058.85 -211.15,-1058.85 -221,-1049 C127.1@-221,-973.65 ; C52.1@-142,204 v1(-126.23,188.19) ; C180.1@-141.9,-48 v1(-126.23,-32.28) ; C36.1@-110,-111.7 -109.9,-111.7 -94.83,-126.77 v1(-94.73,-126.77) ; -102.47,101.5 -94.73,93.77 v1(-94.73,93.7) -94.73,93.62 -79.4,78.28 C40.1@-79.4,78.2 ; v1(-94.73,29.6) -94.17,29.6 -79.57,15 C267.1@-79,15 ; v1(-94.73,-126.77) C33.1@-79,-111.1 ; v1(-94.73,282.68) C184.1@-78.9,266.9 ; v1(-94.6,-63.78) -94.54,-63.78 -79.06,-48.3 C28.1@-79,-48.3 ; C91.1@-79.32,-540 C90.1@-79.32,-575.14 -77.7,-576.76 -77.7,-797.2 -95.5,-815 -182.32,-815 C82.1@-185.32,-818 ; C16.1@-78.3,-301 -78.3,-300.55 -62.6,-284.85 v1(-62.6,-284.39) ; v1(-63.24,-95.28) C38.1@-47.5,-79.6 ; C39.1@-47.7,15 -47.57,15 -31.87,30.71 v1(-31.74,30.71) ; C49.1@-47.5,-174.12 -31.74,-189.88 v1(-31.74,-190) ; C25.1@-47.5,78 -31.77,93.7 -31.52,93.7 -15.82,78 C8.1@-15.6,78 ; C9.1@-47.4,140.9 -47.4,140.97 -31.74,156.63 v1(-31.74,156.69) ; v1(-31.74,-126.77) -31.2,-127.31 -10.35,-127.31 C307.1@0.4,-138.06 ; C303.1@-0.1,201.36 0.1,201.56 C304.1@0.1,249.34 2.94,252.18 v1(32.25,252.18) ; C172.1@15.4,78.1 v1(31.25,62.2) ; C27.1@16.4,-47.4 16.4,-48.16 31.25,-63.02 v1(31.25,-63.78) ; C263.1@47,-142.5 v1(62.75,-126.77) ; C24.1@47,46.4 v1(62.75,30.71) ; C11.1@47.3,109 47.37,109 v1(62.75,93.7) v1(62.75,93.7) ; C30.1@48.3,-49 48.3,-49.17 62.75,-63.61 v1(62.75,-63.78) ; C18.1@78.4,-237.1 v1(94.24,-221.26) 94.34,-221.26 109.9,-205.7 C51.1@110,-205.7 ; C10.1@78.5,109.5 v1(94.24,125.2) C48.1@78.5,140.9 ; C46.1@78.7,-80 78.83,-80 94.11,-95.28 v1(94.24,-95.28) ; C13.1@110,109.6 110,109.52 125.74,93.78 v1(125.74,93.7) ; C26.1@110.2,46.4 110.2,46.32 125.74,30.78 v1(125.74,30.71) 125.82,30.71 155.56,0.97 C306.1@155.56,-1 ; C34.1@110.3,-143 110.3,-142.61 125.74,-127.17 v1(125.74,-126.77) 125.61,-126.77 110.83,-112 C264.1@110.7,-112 ; C31.1@111.3,-49 111.3,-49.17 125.74,-63.61 v1(125.74,-63.78) ; C104.1@118,-666.02 144.87,-666.02 157.15,-653.74 v1(158.77,-653.74) ; C101.1@118,-584.69 151.09,-584.69 157.15,-590.75 v1(158.77,-590.75) ; C103.1@118.09,-789.32 118.05,-789.27 C102.1@118,-747.35 C102.1@118,-747.35 120.55,-744.8 157.85,-744.8 v1(158.77,-745.72) ; v1@123.43,91.44 v1@124.57,92.57 ; v1@124.61,92.57 v1(125.74,93.7) ; C12.1@141.3,109.3 v1(125.74,93.7) ; C15.1@141.7,-80 141.83,-80 157.11,-95.28 v1(157.24,-95.28) ; v1@164.9,-1058.68 C77.1@193.5,-1058.68 ; C45.1@173.1,-268.4 v1(188.73,-252.76) ; C43.1@173.2,-142.4 v1(188.73,-126.77) ; C265.1@173.7,-112 173.83,-112 188.6,-126.77 v1(188.73,-126.77) ; C115.1@179.37,-1216 179.53,-1215.84 179.53,-1124.16 C119.1@179.68,-1124 179.68,-1082.49 160.39,-1063.19 v1(158.77,-1063.19) 141.15,-1045.56 141.15,-1032.15 v1(140,-1031) 141.15,-1029.85 141.15,-1016.75 174.3,-983.6 192.42,-983.6 C76.1@192.5,-983.68 ; v1(220.23,-158.27) 220.3,-158.27 236.13,-174.1 C50.1@236.2,-174.1 ; v1(251.72,-63.78) 251.72,-63.73 267.6,-47.85 C66.1@267.6,-47.8 ; v1(251.72,282.68) 251.8,282.68 267.62,298.5 C60.1@267.7,298.5 ; v1(347,-49) 348.15,-47.85 348.15,-30.2 373.35,-5 C5.2@375.31,-5 ; C128.1@389,-879.32 393.84,-874.47 393.84,-859.61 v1(410.74,-842.71) 412.29,-842.71 418.69,-836.32 C109.1@418.69,-817 ; v1(409,113) 409,111.38 414.68,105.69 R2.1@414.68,78 ; C111.1@414,-1072.68 414,-1070.72 418.84,-1065.87 437.93,-1065.87 440.61,-1063.19 v1(442.24,-1063.19) ; C110.1@414,-997.68 438.11,-997.68 440.61,-1000.19 v1(442.24,-1000.19) ; R56.2@420,-918.69 440.69,-918.69 446.38,-913 v1(448,-913) ; C107.1@524.69,-786 524.78,-785.9 548.7,-785.9 v1(548.8,-785.8) ; C97.1@524.69,-750.86 524.96,-751.13 549.03,-751.13 v1(549.3,-751.4) ; C98.1@524.69,-715.71 524.73,-715.76 v1(549.2,-715.8) v1(549.2,-715.8) ; C99.1@524.69,-680.57 524.95,-680.84 549.54,-680.84 v1(549.8,-681.1) ; C100.1@524.69,-645.43 v1(549.7,-645.4) ; C108.1@524.69,-610.29 v1(549.1,-610.3) ; C105.1@524.69,-575.14 525.36,-574.47 548.03,-574.47 v1(548.7,-573.8) ; C106.1@524.69,-540 524.88,-540.2 549,-540.2 v1(549.2,-540.4) ; v1(695,-41) 696.15,-42.15 709.15,-42.15 717.23,-50.23 C205.1@773.5,-50.23 C301.1@805.5,-50.23 ; v1(777,-317) 777.77,-317.77 806.04,-317.77 C202.1@806.81,-318.54 ; v1(777,-261) 778.15,-262.15 778.15,-278.15 786.23,-286.23 C203.1@808.5,-286.23 ; C298.1@879.5,-325.91 879.75,-326.17 879.75,-364.75 v1(880,-365) ; v1(884.4,193.5) 925.92,235.02 C227.2@966.5,235.02 1074.59,235.02 1085.73,246.15 v1(1087.35,246.15) ; v1(899,-188) 899,-182.35 C215.1@899.5,-181.86 C299.1@925.65,-181.86 ; v1(912,-352) 912.25,-351.75 912.25,-326.48 C210.1@912.5,-326.23 ; v1(930,-187) 933.64,-183.36 958.36,-183.36 v1(963,-188) ; v1(938,-359) 968.39,-359 C230.2@968.5,-359.1 ; v1(993,-61) 994.62,-61 997.4,-58.23 R62.2@1024.5,-58.23 ; v1(993.24,-187.77) 1007.33,-173.67 1016.65,-173.67 1021.5,-168.83 C204.1@1021.5,-166.86 ; C231.2@1021.5,-359.1 1021.6,-359 v1(1056,-359) ; C207.1@1070.5,161.14 C206.1@1102.5,161.14 1102.58,161.22 1154.24,161.22 1160.1,167.08 1160.1,224.6 v1(1159.1,225.6) ; C300.1@1130.81,-64.54 1132.78,-64.54 1137.62,-69.39 1137.62,-80.52 1150.38,-93.28 v1(1150.72,-93.28) ; C297.1@1155.5,-222.23 1157.17,-223.9 1175.96,-223.9 1180.6,-219.27 v1(1182.22,-219.27) ; C219.1@1241.06,125.46 v1(1241.14,125.37) ; v1(1243.06,12.46) 1248.18,7.33 v1(1248.18,-29.54) ; C217.1@1249.18,-96.54 1249.41,-96.31 1318.43,-96.31 v1(1318.66,-96.08) ; C200.1@1282.5,-26.86 1305.28,-26.86 v1(1307.12,-28.7)
  Bottom w12: v1(-2348,451) -2347.23,451.77 -2339.92,451.77 -2311,480.69 C296.2@-2311,486 ; C171.2@-2291,-27 -2291,27.48 -2286.56,31.92 v1(-2286.56,33)
  Bottom w20: v1(-739,1087) -706.63,1119.37 R126.1@-669,1119.37
  other v1: 1879.25,-921.43 1945,-921.43 2010.75,-921.43 -494,-903.56 981.98,-872.16 1292.8,-868 1364.06,-868 1435.33,-868 1506.59,-868 1580.18,-867.62 1651.44,-867.62 1722.71,-867.62 1793.97,-867.62 1865.23,-867.62 1936.5,-867.62 2007.76,-867.62 1237.8,-854.3 698.98,-853.28 1029.98,-853.28 1192.4,-815.5 1579.08,-779.32 1650.34,-779.32 1721.61,-779.32 1792.87,-779.32 1864.13,-779.32 1935.4,-779.32 2006.66,-779.32 1154.4,-777.6 1363.57,-777.7 1434.84,-777.7 1506.1,-777.7 1293.3,-775.1 1244.9,-742.3 1113.9,-737.1 699,-728.32 1030,-728.31 1879.25,-724.57 1945,-724.57 2010.75,-724.57 744.98,-709.04 981.98,-709.04 1208.2,-704.9 1076.1,-699.3 1169.5,-666.8 1042.8,-665.6 -752,-657.5 -788,-656.5 -714,-656.5 1143.4,-640.4 1013.3,-637.4 -752,-623.75 -788,-622.75 -714,-622.75 1019.7,-614.1 -752,-590 -788,-589 -714,-589 1046.48,-587.1 1073.25,-560.1 -752,-556.25 -788,-555.25 -714,-555.25 1100.02,-533.1 -788,-521.5 -752,-522.5 -714,-521.5 1126.8,-506.1 -1596.7,-484.5 -1541.6,-483.1 -1430.6,-482.8 -1480.7,-482.4 1448.4,-412.6 1505,-411.4 1578,-411.3 1397.5,-394.15 1643.9,-393.9 1879.25,-374.57 1945,-374.57 2010.75,-374.57 -832.09,-357.68 -800,-357.68 -719.09,-357.68 1397.5,-356.53 1693,-351.8 1576.4,-326.4 1506.9,-325.1 1735.8,-322.9 1797.8,-321.1 1869.06,-321.1 1940.33,-321.1 2011.59,-321.1 1397.5,-318.9 1626.6,-291 -2303,-288 -2335,-287 -2274,-287 1397.5,-281.28 -2334,-257 -2304,-257 -2275,-257 -2250,-256 1669.1,-253.6 1397.5,-243.65 1726,-234.3 1796.6,-233.9 1867.86,-233.9 1939.13,-233.9 2010.39,-233.9 -821,-231 -790,-231 -759,-231 -728,-231 -2254.32,-225 -822,-203 -791,-203 -760,-203 -729,-203 1879.25,-177.72 1945,-177.72 2010.75,-177.72 -822,-171 -791,-171 -760,-171 -698,-171 -2295.05,-158.32 -457.5,-141 -1471.5,-130 -1404,-130 -1336.5,-130 -2258.32,-84 -1471.04,-65.47 -1403.54,-65.47 -1336.04,-65.47 604,-47 662,-41 -1471.5,2 -1404,2 -1336.5,2 661,2 -2336,7 752,31 -2336,33 -2310,33 689.87,35.87 751,95 1453.5,100.5 1508.5,100.6 1580.3,101.7 1397.1,117.75 1648.5,129.9 721,145 1397.1,155.38 -2200,159 -2161.93,159 -2112.61,159 -2063.28,159 -2013.96,159 -1964.63,159 -1915.3,159 -1865.98,159 -1816.65,159 -1767.33,159 -1718,159 -1672,159 1879.25,172.29 1945,172.29 2010.75,172.29 1696.5,177.7 1507.2,183.8 -1624,191 1397.1,193 1588.2,197.9 -2201,219 -2160.93,219 -2111.61,219 -2062.28,219 -2012.96,219 -1963.63,219 -1914.3,219 -1864.98,219 -1815.65,219 -1766.33,219 -1717,219 1740.2,219.9 -1599,224 1797.4,225.2 1868.7,225.2 1939.9,225.2 2011.2,225.2 1397.1,230.62 1637.3,243.2 1072.1,256.8 1397.1,268.25 1056.2,269.2 -900.82,276 -835.41,276 -770,276 -450.79,278.93 -2175.93,284 -2126.61,284 -2077.28,284 -2027.96,284 -1978.63,284 -1929.3,284 -1879.98,284 -1830.65,284 -1781.33,284 -1732,284 -1755,288 1683.9,288.4 -2308,292 -1687.2,292.9 -1521,302 1047.6,310.3 1078.4,310 1736.1,312.3 1797.5,314.6 1868.76,314.6 1940.03,314.6 2011.29,314.6 -2290.73,318 -1485,334 -1446.9,334.5 -901.82,342 -836.41,342 -771,342 -705.59,342 -640.18,342 -2309,344 -1756,349 -2199,352 -2168,353 -2130.61,353 -2081.28,353 -2031.96,353 -1982.63,353 -1933.3,353 -1883.98,353 -1834.65,353 -1785.33,353 -1736,353 -1329,356 -1135.6,357.9 1879.25,369.14 1945,369.14 2010.75,369.14 -1329,382 1128.1,386.3 -1135.4,392.4 -901.82,404 -836.41,404 -771,404 -705.59,404 -640.18,404 1174.6,404.8 1101.1,413.07 -2200,415 -2163.93,415 -2114.61,415 -2065.28,415 -2015.96,415 -1966.63,415 -1917.3,415 -1867.98,415 -1818.65,415 -1646,416 -1329,436 1074.1,439.85 1210.7,440.9 416.8,448.8 -1329,461 1047.1,466.62 -901.82,470 -836.41,470 -771,470 -705.59,470 -640.18,470 -1705,475 -2160.63,476 -2111.3,476 -2061.98,476 -2012.65,476 -1963.33,476 -1914,476 -1861.33,476 -1554.2,476.1 -1639,477 1251.2,482.2 -1202,487 1020.1,493.4 355.1,509.1 -1404,510 -1596,515 1164.2,520.9 1292.8,523.4 -1238,527 -902.82,535 -837.41,535 -772,535 -706.59,535 -641.18,535 -1124.1,548.7 -1553,554 -1339,555 1205.3,561.9 -1407,564 1334.3,564.7 82.3,566.2 186.2,568.3 273.1,569.2 -1499,571 -1212,572 -1391,584 976.77,592.37 1246.2,602.8 1380.4,610.9 -2453.55,613.38 -2416.46,614.06 -2376.06,614.06 -961,624.54 -1434,627 1287.8,644.3 -1400.5,650.8 1420.7,651.6 -1307,653 -1250,656 -1195,658 -962,669 1333.6,690.9 1461.2,691.9 -1154,703 1879.25,719.15 1945,719.15 2010.75,719.15 -1011,729 -961,730 1374.3,731.2 1502,732.7 -1122,739 -2453.55,743.3 -2416.46,743.98 -2376.06,743.98 -819,758 1414.5,771.5 1579.98,774.98 1651.24,774.98 1722.51,774.98 1793.77,774.98 1865.03,774.98 1936.3,774.98 2007.56,774.98 -1074,782 -855,793 -1026,797 -668,798 -967,801 -906,801 1454.6,811.6 -631,818.69 -705,819.69 -668,825.33 1499.2,846.1 -668,852.67 1577.82,861 1649.08,861 1720.35,861 1791.61,861 1862.87,861 1934.14,861 2005.4,861 -843,865 -496.1,865.3 -2453.55,871.37 -2416.46,872.05 -2376.06,872.05 -668,880 -1223,889 -1190,889 -1223,916 -1190,916 1879.25,916 1945,916 2010.75,916 -668,928 -1223,943 -1190,943 -1223,970 -1190,970 -1223,997 -1190,997 -2453.55,1001.29 -2416.46,1001.97 -2376.06,1001.97 674.03,1020.7 790.17,1020.7 914.89,1020.7 1031.03,1020.7 1155.74,1020.7 1271.88,1020.7 1396.6,1020.7 1512.74,1020.7 -360,1061 81,1083.37 115,1083.37 183,1083.37 217,1083.37 -361,1086 -326.56,1086.69 -226,1088.37 -192,1088.37 -158,1088.37 -361,1116 80,1116 114,1116 148,1116 182,1116 216,1116 -193,1121 -159,1121 -125,1121 -91,1121
  other v2: -577.32,-975.53 -597,-946 -616.69,-916.47 864.39,-818.8 841.76,-781.4 887.03,-781.4 864.39,-744 -1124.21,-636.55 -1174.41,-606.04 -1074.02,-606.04 -1124.21,-575.53 859.18,645.73 836.54,683.13 881.82,683.13 859.18,720.53 -1851,760.69 -1807.69,760.69 -1851,804 -1807.69,804 219.47,979.37 278.53,979.37 -324.09,982.69 -294.56,982.69 -265.03,982.69 -53.53,984.37 5.53,984.37
  other v3: -2462,-1178 1861,-1178 -2462,1178 1861,1178
JTAG_USB_N: J5.A7 J5.B7 U7.2 U10.7 | length 1295.9
  Top w4.8: J5.A7@-2376.47,-136.92 -2374.04,-139.35 -2349.81,-139.35 ; J5.B7@-2376.47,-97.55 -2346.45,-97.55 -2340.17,-103.83 -2340.17,-129.71 -2349.81,-139.35 ; U10.7@-1433.06,-240.67 -1430.62,-243.11 -1430.62,-291.56 -1430.62,-345 -1461.62,-376 -1643,-376 -1868.4,-150.6 -2193.89,-150.6 -2208.28,-150.6 -2211.09,-147.79 -2211.09,-142.07 -2212.56,-140.6 -2219.42,-140.6 -2220.89,-142.07 -2220.89,-155.13 -2222.36,-156.6 -2229.22,-156.6 -2230.69,-155.13 -2230.69,-142.07 -2232.16,-140.6 -2239.02,-140.6 -2240.49,-142.07 -2240.49,-147.79 -2243.3,-150.6 -2245.7,-150.6 -2254.95,-150.6 -2257.76,-147.79 -2257.76,-147.73 U7.2@-2261.27,-144.22 -2264.77,-147.73 -2264.77,-147.79 -2267.59,-150.6 -2282.41,-150.6 -2289.09,-143.92 -2306.32,-143.92 -2313,-150.6 -2329.19,-150.6 -2340.44,-139.35 -2349.81,-139.35
JTAG_USB_P: J5.A6 J5.B6 U7.1 U10.8 | length 1298.5
  Top w4.8: J5.A6@-2376.41,-117.24 -2377.61,-118.44 -2403.44,-118.44 -2411,-126 -2411,-150 -2404.39,-156.61 J5.B6@-2376.41,-156.61 -2373.95,-154.15 -2346.57,-154.15 -2335.32,-165.4 -2313,-165.4 -2305.68,-172.72 -2289.09,-172.72 -2281.77,-165.4 -2267.59,-165.4 -2264.77,-168.21 -2264.77,-168.27 U7.1@-2261.27,-171.78 -2257.76,-168.27 -2257.76,-168.21 -2254.95,-165.4 -1874.53,-165.4 -1649.13,-390.8 -1455.49,-390.8 -1415.82,-351.13 -1415.82,-285.43 -1415.82,-243.11 U10.8@-1413.38,-240.67
LAN_1V0: C62.1 C139.2 C140.2 C141.2 C146.2 C147.2 C148.2 U6.3 U6.8 U6.21 U6.30 U6.38 | length 1068.9
  Top w8: v1(-887,-216) -884.84,-216 -879.3,-210.46 -858.46,-210.46 U6.38@-858.4,-210.4 ; v1(-800,-295) v1@-799.46,-294.46 ; U6.3@-799.46,-269.46 U6.3@-799.4,-269.4 ; v1(-721,-294) v1@-720.66,-293.66 ; U6.8@-720.66,-269.46 U6.8@-720.6,-269.4 ; U6.21@-689.1,-72.6 -661.6,-72.6 -644,-55 -644,-53 v1(-643,-52) ; C148.2@-672,-21.69 C147.2@-639,-21.69 v1@-639,-46.38
  Top w10: C146.2@-842,-21.69 -846.84,-26.53 -846.84,-50.84 v1(-847,-51) -840.82,-51 -830.9,-60.91 U6.30@-830.9,-72.6 ; v1@-799.46,-294.46 U6.3@-799.46,-269.46 ; v1@-720.66,-293.66 U6.8@-720.66,-269.46
  Layer 2 w10: v1(-847,-51) -826.1,-71.9 -662.9,-71.9 v1(-643,-52)
  Bottom w10: v1(-887,-216) -862.1,-216 ; v1(-847,-51) C62.1@-847,-15.5 ; C62.1@-846,-14.5 -846,-16.88 -856.75,-27.63 -871.93,-27.63 -887.8,-43.5 -887.8,-93 -862.1,-118.7 -862.1,-216 ; C139.2@-832.09,-318.31 C141.2@-800,-318.31 v1(-800,-295) ; C140.2@-719.09,-318.31 -720.05,-317.36 -720.05,-294.95 v1(-721,-294) -721.5,-294.5 -799.5,-294.5 v1(-800,-295) ; -862.1,-216 -862.1,-277.7 -844.8,-295 v1(-800,-295)
LAN_3V3A: C63.2 C74.2 C75.2 L4.2 U6.11 U6.40 | length 495
  Top w7: v1(-888.99,-249.07) -888.99,-247.01 -883.9,-241.9 U6.40@-858.4,-241.9 ; L4.2@-604.69,-246.13 L4.2@-601.56,-243
  Top w8: U6.11@-661.6,-241.9 -661.43,-242.07 -642.37,-242.07 -637.44,-247 v1(-635,-247) ; L4.2@-605.56,-247 L4.2@-604.69,-246.13
  Top w10: v1(-635,-247) L4.2@-605.56,-247 ; C75.2@-604.69,-283 L4.2@-604.69,-246.13
  Layer 2 w10: v1(-888.99,-249.07) -638.69,-249.07 -636.62,-247 v1(-635,-247)
  Bottom w10: C74.2@-918.32,-280 -916.32,-278 -896,-278 -888.99,-270.99 v1(-888.99,-249.07) ; v1(-635,-247) -618.74,-263.26 -618.74,-270.92 -606.65,-283 C63.2@-604.69,-283
MDI0_N: J2.3 U6.2 | length 1638.4
  Top w4: J2.3@-1905.55,-579.8 -1942.19,-543.16 -1942.19,-539.84 -1932.14,-529.8 -1890,-529.8 -1860.9,-529.8 -1858.56,-532.14 -1858.56,-540.25 -1849,-549.8 -1831.11,-549.8 -1821.56,-540.25 -1821.56,-511.15 -1820.21,-509.8 -1813.91,-509.8 -1812.56,-511.15 -1812.56,-540.25 -1803,-549.8 -1785.11,-549.8 -1775.56,-540.25 -1775.56,-511.15 -1774.21,-509.8 -1767.91,-509.8 -1766.56,-511.15 -1766.56,-540.25 -1757,-549.8 -1739.11,-549.8 -1729.56,-540.25 -1729.56,-511.15 -1728.21,-509.8 -1721.91,-509.8 -1720.56,-511.15 -1720.56,-540.25 -1711,-549.8 -1693.11,-549.8 -1683.56,-540.25 -1683.56,-511.15 -1682.21,-509.8 -1675.91,-509.8 -1674.56,-511.15 -1674.56,-540.25 -1665,-549.8 -1647.11,-549.8 -1637.56,-540.25 -1637.56,-511.15 -1636.21,-509.8 -1629.91,-509.8 -1628.56,-511.15 -1628.56,-519.26 -1618.01,-529.8 -1601,-529.8 -1536,-529.8 -1507,-529.8 -1405,-529.8 -1186.2,-311 -830.05,-311 -816,-296.95 -816,-284.85 -815.84,-284.69 -815.84,-270.14 U6.2@-815.1,-269.4
MDI0_P: J2.2 U6.1 | length 1640.1
  Top w4: J2.2@-2005.55,-525.9 -2000.49,-530.95 -1969.55,-530.95 -1966.72,-530.95 -1964.37,-528.61 -1964.37,-525.3 -1965.7,-523.97 -1965.7,-522.06 -1961.24,-517.61 -1959.33,-517.61 -1951.2,-525.74 -1947.88,-525.74 -1937.94,-515.8 -1890,-515.8 -1855.1,-515.8 -1844.56,-526.34 -1844.56,-534.45 -1843.21,-535.8 -1836.91,-535.8 -1835.56,-534.45 -1835.56,-505.35 -1826,-495.8 -1808.11,-495.8 -1798.56,-505.35 -1798.56,-534.45 -1797.21,-535.8 -1790.91,-535.8 -1789.56,-534.45 -1789.56,-505.35 -1780,-495.8 -1762.11,-495.8 -1752.56,-505.35 -1752.56,-534.45 -1751.21,-535.8 -1744.91,-535.8 -1743.56,-534.45 -1743.56,-505.35 -1734,-495.8 -1716.11,-495.8 -1706.56,-505.35 -1706.56,-534.45 -1705.21,-535.8 -1698.91,-535.8 -1697.56,-534.45 -1697.56,-505.35 -1688,-495.8 -1670.11,-495.8 -1660.56,-505.35 -1660.56,-534.45 -1659.21,-535.8 -1652.91,-535.8 -1651.56,-534.45 -1651.56,-505.35 -1642,-495.8 -1624.11,-495.8 -1614.56,-505.35 -1614.56,-513.46 -1612.21,-515.8 -1601,-515.8 -1536,-515.8 -1507,-515.8 -1410.8,-515.8 -1192,-297 -835.85,-297 -830,-291.15 -830,-284.85 -830.16,-284.69 -830.16,-270.14 U6.1@-830.9,-269.4
MDI1_N: J2.7 U6.5 | length 1643.8
  Top w4: J2.7@-1905.55,-779.8 -1869.55,-743.8 -1869.55,-664.89 -1870.83,-663.6 -1870.83,-660.29 -1844.27,-633.73 -1783.54,-573 -1745,-573 -1645,-573 -1609.9,-573 -1607.55,-575.34 -1607.55,-577.66 -1598,-587.21 -1580.11,-587.21 -1570.55,-577.66 -1570.55,-554.35 -1569.2,-553 -1562.9,-553 -1561.55,-554.35 -1561.55,-583.45 -1552,-593 -1534.11,-593 -1524.55,-583.45 -1524.55,-554.35 -1523.2,-553 -1516.9,-553 -1515.55,-554.35 -1515.55,-583.45 -1506,-593 -1488.11,-593 -1478.55,-583.45 -1478.55,-554.35 -1477.2,-553 -1470.9,-553 -1469.55,-554.35 -1469.55,-583.45 -1460,-593 -1442.11,-593 -1432.55,-583.45 -1432.55,-575.34 -1430.21,-573 -1424.11,-573 -1394,-573 -1382,-561 -1163,-342 -792.95,-342 -768.75,-317.8 -768.75,-284.8 -768.64,-284.69 -768.64,-270.14 U6.5@-767.9,-269.4
MDI1_P: J2.4 U6.4 | length 1643.8
  Top w4: J2.4@-2005.55,-625.9 -1993.27,-625.9 -1970.14,-625.9 -1968.14,-625.9 -1965.79,-623.56 -1965.79,-619.29 -1964.44,-617.94 -1958.14,-617.94 -1956.79,-619.29 -1956.79,-623.56 -1954.45,-625.9 -1920.27,-625.9 -1908.53,-625.9 -1884.05,-650.39 -1880.73,-650.39 -1867.45,-637.11 -1847.02,-616.67 -1789.34,-559 -1759,-559 -1745,-559 -1645,-559 -1604.1,-559 -1593.55,-569.54 -1593.55,-571.86 -1592.2,-573.21 -1585.9,-573.21 -1584.55,-571.86 -1584.55,-548.55 -1575,-539 -1557.11,-539 -1547.55,-548.55 -1547.55,-577.65 -1546.2,-579 -1539.9,-579 -1538.55,-577.65 -1538.55,-548.55 -1529,-539 -1511.11,-539 -1501.55,-548.55 -1501.55,-577.65 -1500.2,-579 -1493.9,-579 -1492.55,-577.65 -1492.55,-548.55 -1483,-539 -1465.11,-539 -1455.55,-548.55 -1455.55,-577.65 -1454.2,-579 -1447.9,-579 -1446.55,-577.65 -1446.55,-569.54 -1436.01,-559 -1424.11,-559 -1399.8,-559 -1382,-541.2 -1168.8,-328 -798.75,-328 -782.75,-312 -782.75,-284.8 -782.86,-284.69 -782.86,-270.14 U6.4@-783.6,-269.4
MDI2_N: J2.6 U6.7 | length 1643.5
  Top w4: J2.6@-2005.55,-725.9 -1953.23,-725.9 -1950.89,-728.24 -1950.89,-731.56 -1955.55,-736.22 -1955.55,-800.51 -1926.26,-829.8 -1870,-829.8 -1658.2,-618 -1382,-618 -1151,-387 -768.2,-387 -737.25,-356.05 -737.25,-284.8 -737.14,-284.69 -737.14,-270.14 U6.7@-736.4,-269.4
MDI2_P: J2.5 U6.6 | length 1643.8
  Top w4: J2.5@-1905.55,-679.8 -1940.88,-715.14 -1940.88,-718.45 -1936.89,-722.44 -1936.89,-737.36 -1941.55,-742.01 -1941.55,-794.71 -1920.46,-815.8 -1875.8,-815.8 -1863.15,-803.15 -1852.57,-792.57 -1852.57,-789.26 -1861.1,-780.73 -1861.1,-778.82 -1856.65,-774.36 -1854.74,-774.36 -1841.26,-787.84 -1839.35,-787.84 -1834.9,-783.38 -1834.9,-781.47 -1836.53,-779.84 -1836.53,-776.53 -1835.12,-775.12 -1827.54,-767.54 -1664,-604 -1387.8,-604 -1156.8,-373 -774,-373 -751.25,-350.25 -751.25,-284.8 -751.36,-284.69 -751.36,-270.14 U6.6@-752.1,-269.4